# Altium PCB PCB1.PcbDoc (part 1 of 2)
Units mil, origin at the board's own origin, x right, y up, seen from the top; angles counter-clockwise.
Board outline 2620 x 2515 mil, 2 copper layers (Top Layer, Bottom Layer); 69 components, 45 nets, 203 pads, 16 vias.
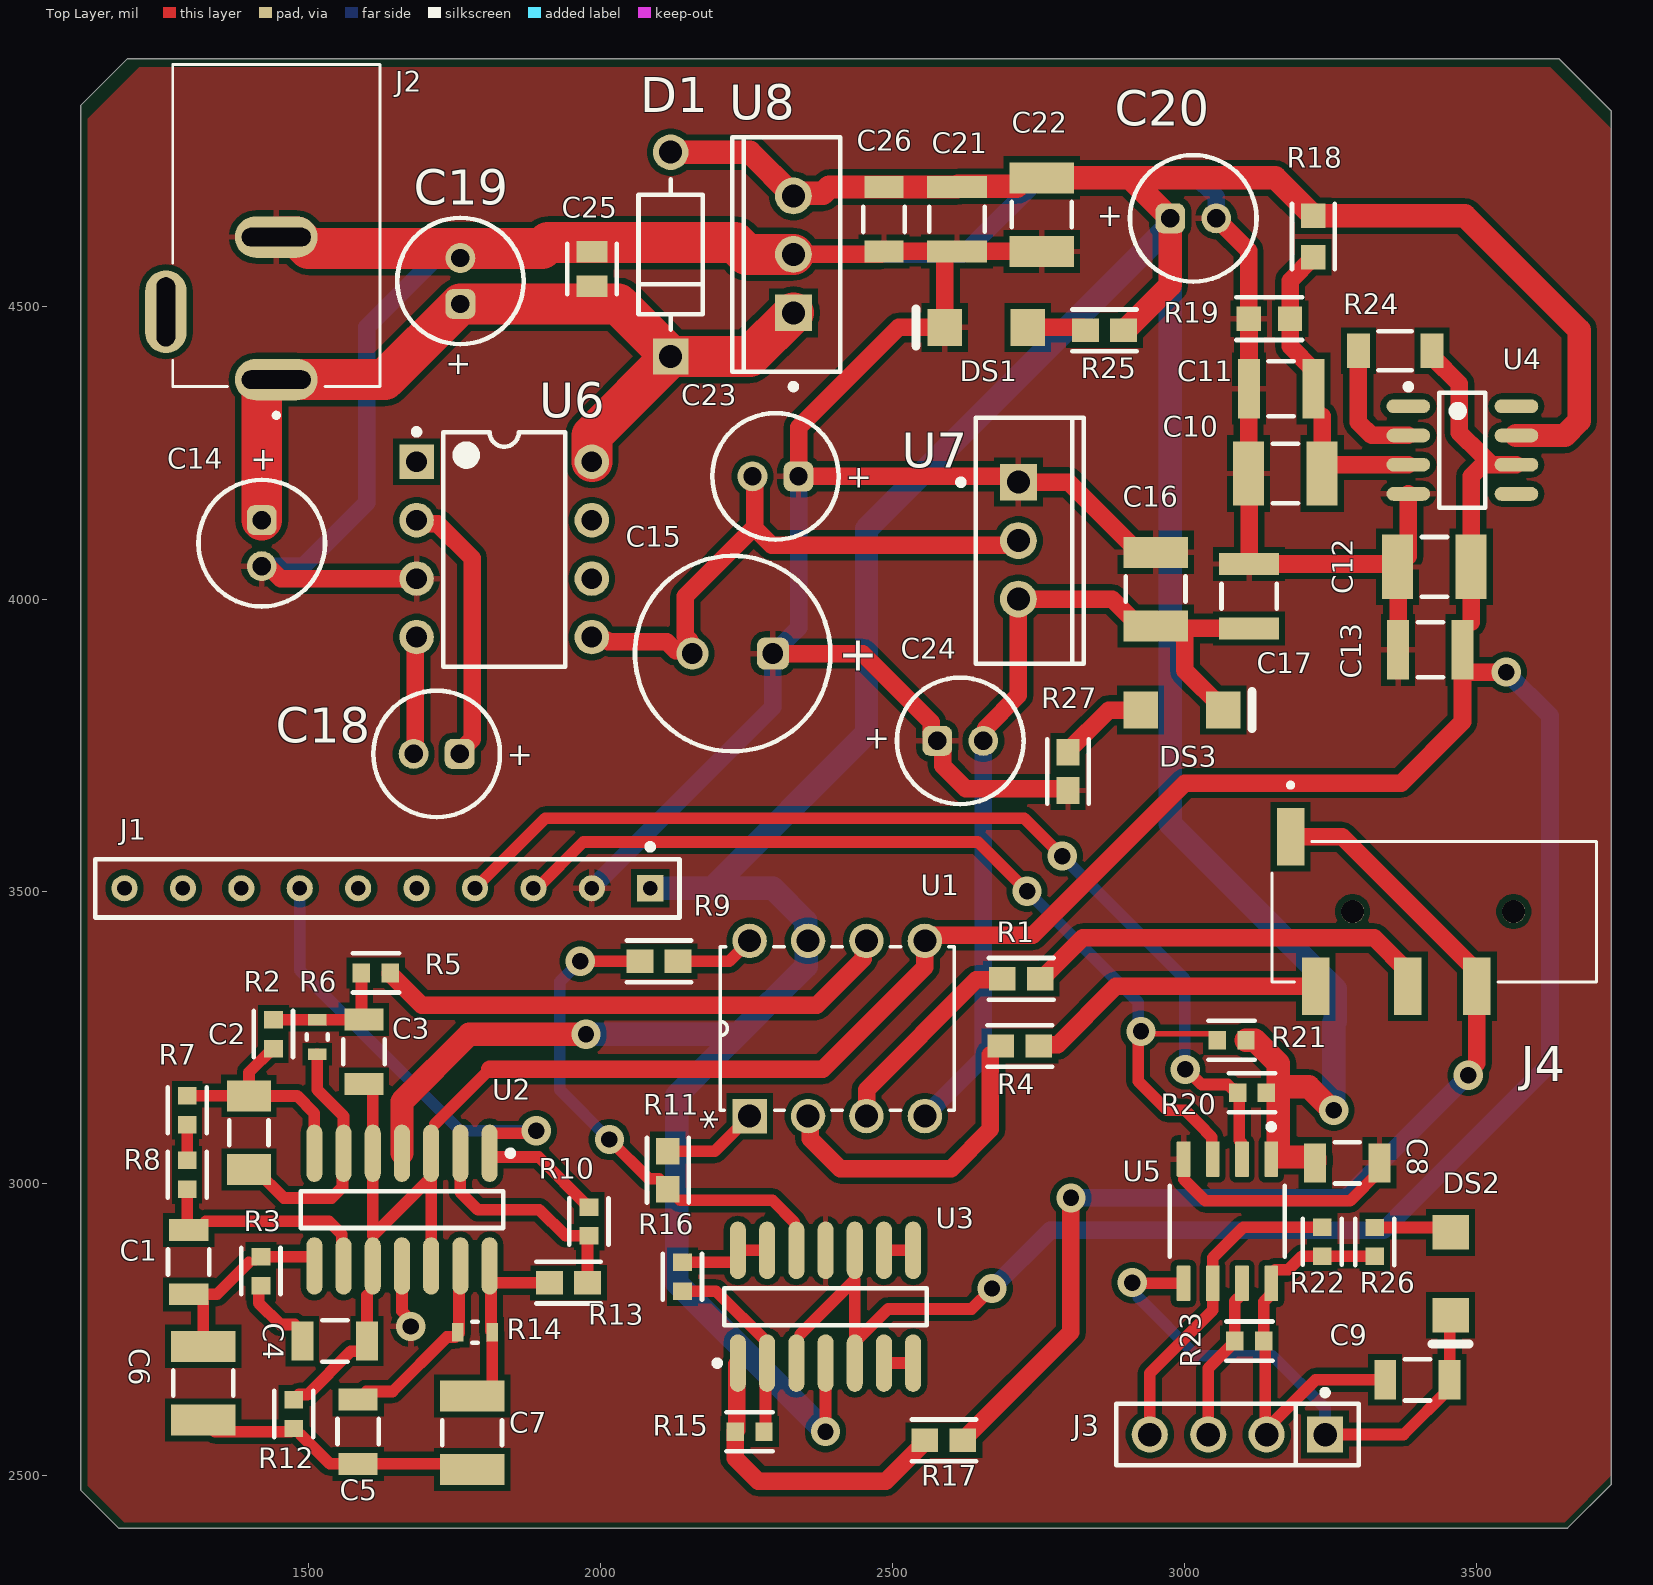
[diagram p0: Top Layer view]
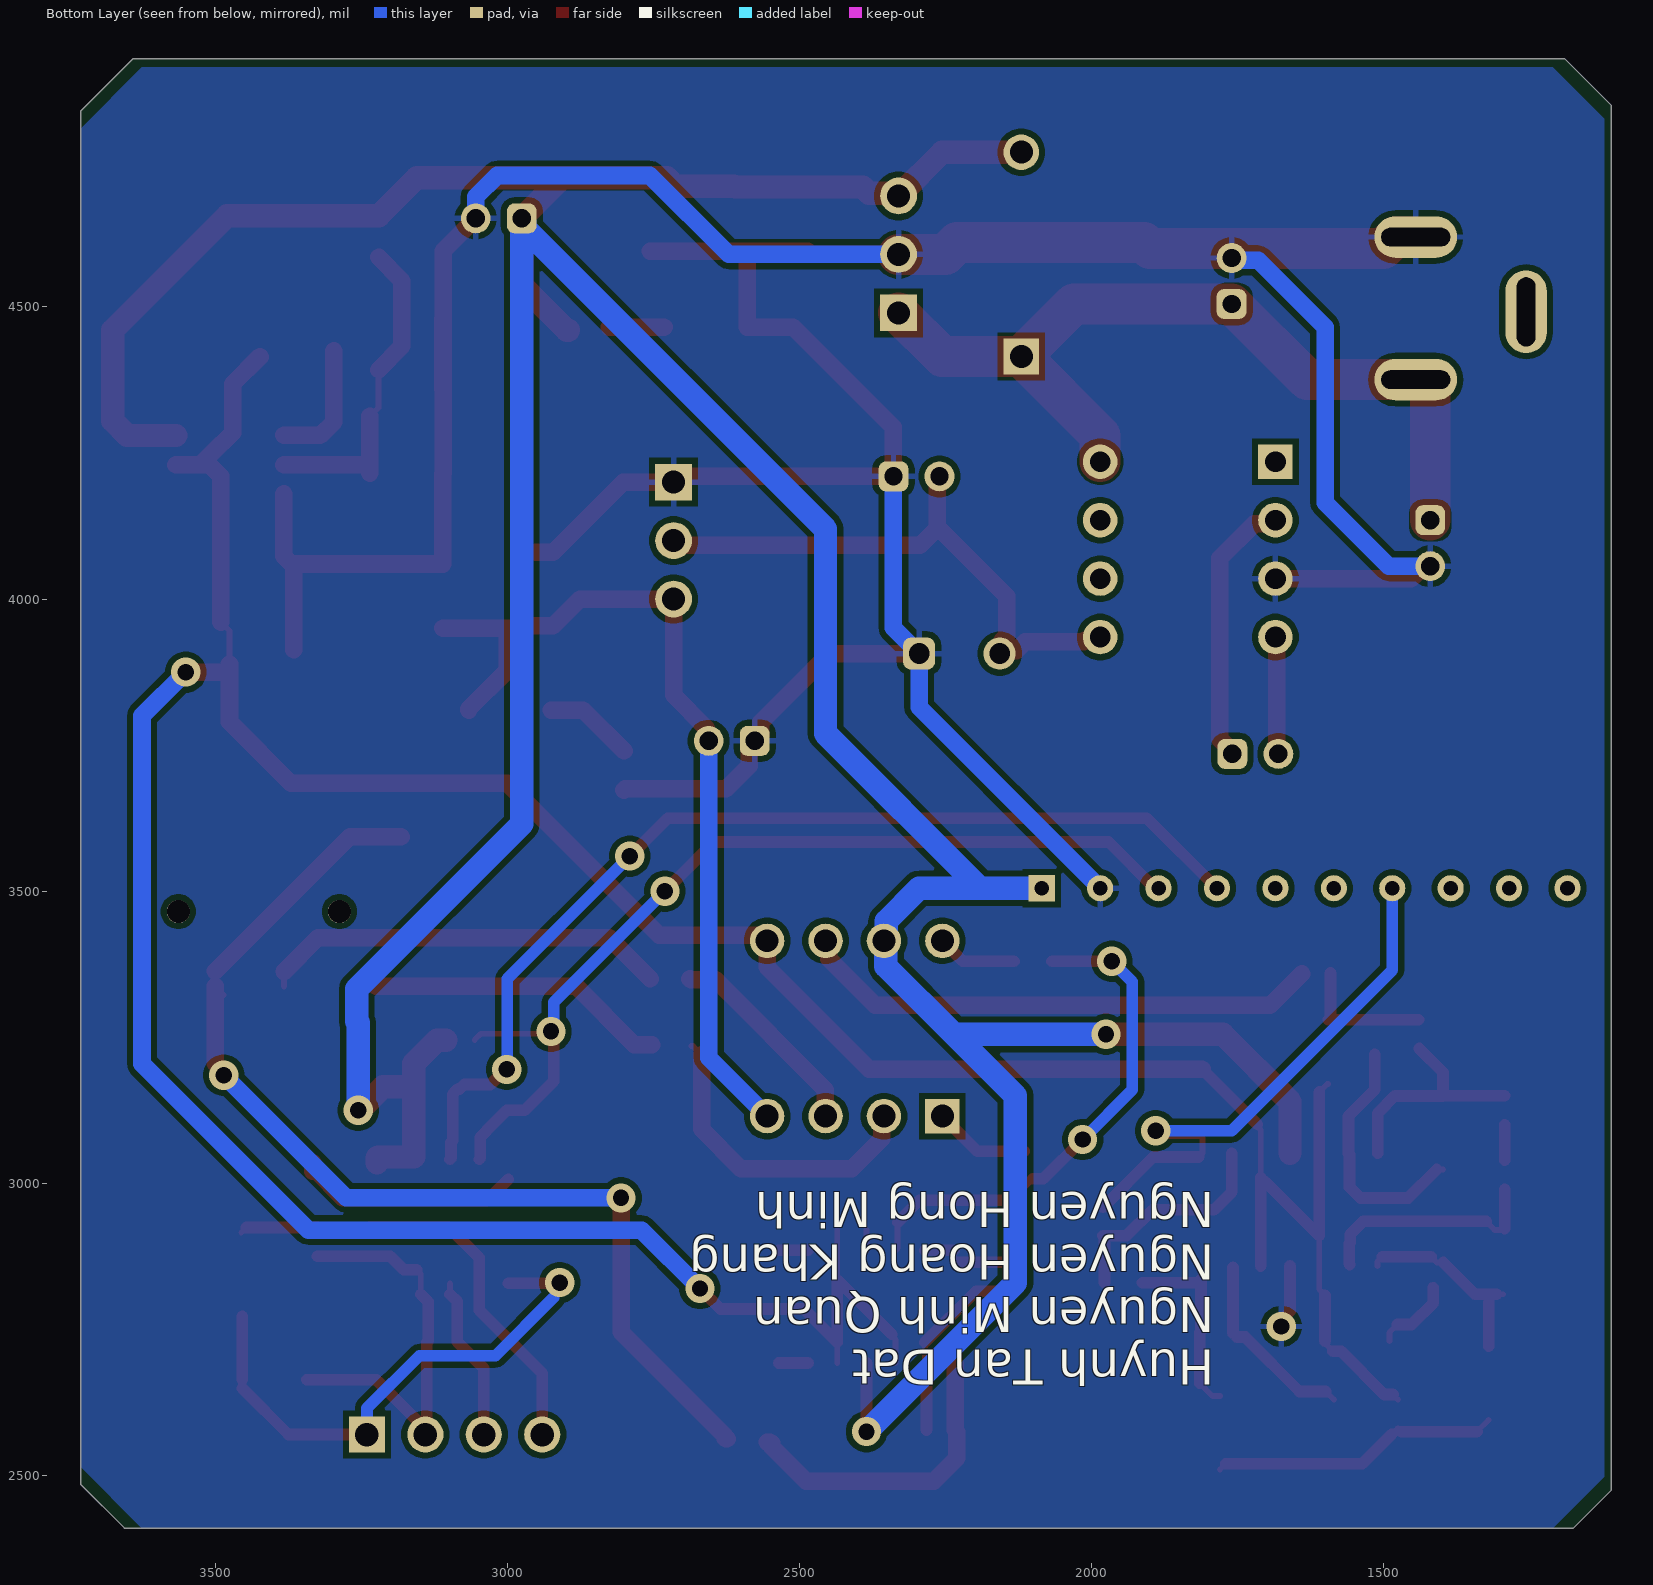
[diagram p1: Bottom Layer view, seen from below]
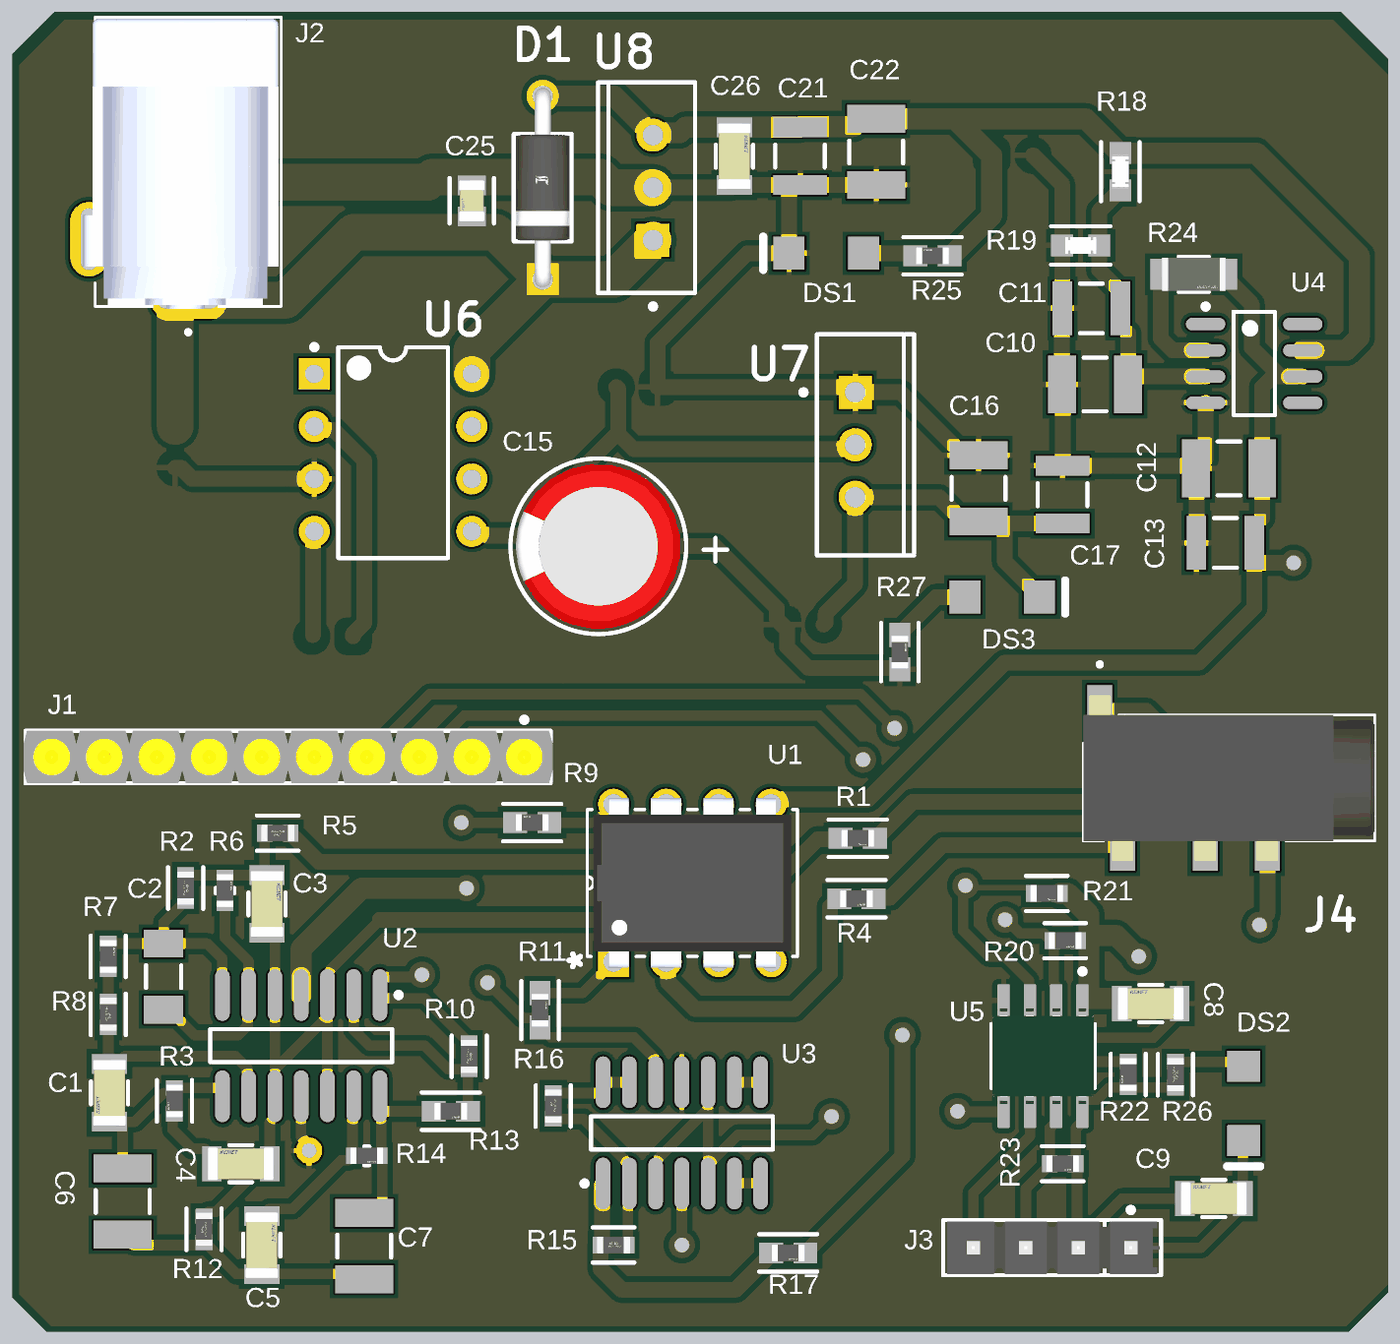
[diagram p2: 3D render of the assembled board from above, using the file's embedded part models]

## Layer stack, top to bottom
Top Solder: solder mask 0.4, Solder Resist, Dk 3.5
Top Layer: signal copper 1.4
Dielectric 1: dielectric 12.6, FR-4, Dk 4.8
Bottom Layer: signal copper 1.4
Bottom Solder: solder mask 0.4, Solder Resist, Dk 3.5

## Board outline
1190,4925 1110,4845 1110,2475 1175,2410 3655,2410 3730,2485 3730,4835 3640,4925

## Design rules (kind name [scope] priority, off if disabled: settings)
Clearance [All] p1: gap=10 ignorepadtopadclearanceinfootprint=FALSE except(0: Arc-Hole Track-Hole SMDPad-Hole THPad-Hole Via-Hole Fill-Hole Poly-Hole Region-Hole Text-Hole)
PolygonConnect [All] p1: connectstyle=Relief reliefconductorwidth=10 reliefentries=4 polygonreliefangle="90 Angle" airgapwidth=10
RoutingVias [All] p1: holewidth=28 width=50 viastyle="Through Hole" minholewidth=28 minwidth=50 maxholewidth=28 maxwidth=50
SolderMaskExpansion [All] p1: expansion=4 istentingtop=FALSE
Width [All] p1: maxlimit=70 minlimit=10 preferedwidth=10 minimp=50.000000 maximp=50.000000 favimp=50.000000
30 further rules are at their usual default settings.

## Classes and differential pairs
component class Sheet3: DS3 J1 J2 J3 J4 R27
component class Sheet2: C8 C9 C10 C11 C12 C13 C14 C15 C16 C17 C18 C19 C20 C21 C22 C23 C24 C25 C26 D1 DS1 DS2 R18 R19 R20 R21 R22 R24 R25 R26 U4 U5 U6 U7 U8
component class Sheet1: C1 C2 C3 C4 C5 C6 C7 R1 R2 R3 R4 R5 R6 R7 R8 R9 R10 R11 R12 R13 R14 R15 R16 R17 U1 U2 U3

## Components (designator, comment, footprint, x,y, rotation, side; value= is the part's Value field where it differs from the comment)
C1 "10n" FP-C1206C-EB-MFG 1295,2865.12 r90 top value="10,000 pF"
C2 "4.7nF" CAPC1206(3216)170_M 1398.02,3086.6 r90 top
C3 "68n" FP-C1206C-EB-MFG 1595,3225.12 r270 top value="68,000 pF"
C4 "47n" FP-C1206C-EB-MFG 1545.12,2730 r0 top value="47,000 pF"
C5 "68n" FP-C1206C-EB-MFG 1585,2574.88 r270 top value="68,000 pF"
C6 "100nF" CAPC1210(3225)115_M 1320,2657.99 r90 top
C7 "100nF" CAPC1210(3225)115_M 1780,2572.99 r270 top
C8 "0.1uF" FP-C1206C-EB-MFG 3277.97,3035.1 r0 top value="0.10 μF"
C9 "0.1uF" FP-C1206C-EB-MFG 3398.04,2663.73 r0 top value="0.10 μF"
C10 "10uF" CAPC1210(3225)230_M 3172.01,4215 r0 top
C11 "100nF" CAPC1210(3225)190_L 3164.88,4360 r0 top
C12 "10uF" CAPC1210(3225)230_M 3427.01,4055 r0 top
C13 "100nF" CAPC1210(3225)190_L 3420.12,3913.1 r0 top
C14 "2.2uF" WCAP-ATG8_D5H11 -48580,54095.63 r90 top
C15 "100uF" WCAP-PTG5_D8H11.5 2225.97,3906.68 r0 top
C16 "10uF" CAPC1210(3225)230_M 2950,4017.01 r270 top
C17 "100nF" CAPC1210(3225)190_L 3110,4004.88 r270 top
C18 "10uF" WCAP-ATG5_D5H11 51719.37,53735 r0 top
C19 "470nF" WCAP-ATG5_D5H11 51760,-45455.63 r270 top
C20 "470nF" WCAP-ATG5_D5H11 -46985.63,-45348.33 r180 top
C21 "100nF" CAPC1210(3225)190_L 2610,4650.12 r90 top
C22 "10uF" CAPC1210(3225)230_M 2755,4657.99 r90 top
C23 "33uF" WCAP-ATG5_D5H11 52299.37,54210 r0 top
C24 "33uF" WCAP-ATG5_D5H11 -47384.37,-46242.69 r180 top
C25 "0.33uF" FP-C0805C-DN-MFG 1985,4565 r90 top value="0.33 μF"
C26 "0.1uF" FP-C1206C-EB-MFG 2485,4650 r270 top value="0.10 μF"
D1 "1N4007" FP-1N4007-MFG 2120,4590 r90 top value=15pF
DS1 "" LTST-C230KGKT_V 2660,4465 r180 top
DS2 "" LTST-C230KGKT_V 3455,2845 r270 top
DS3 "" LTST-C230KGKT_V 2995,3810 r0 top
J1 "ADS1115" FP-TS-110-T-A-MFG 1635,3505 r180 top
J2 "PJ-035D" CUI_PJ-035D 1444.87,4375.52 r180 top
J3 "I2C" FP-TSW-104-23-T-S-MFG 3090,2570 r180 top
J4 "PJ-320D-A" HRO_PJ-320D-A 3425,3465 r180 top
R1 "1k" FP-ESR03-IPC_A 2720,3350 r180 top
R2 "22k" FP-CRGP0603-IPC_C 1440,3255.32 r270 top value=22KΩ
R3 "56k" FP-ESR03-IPC_C 1418.69,2849.68 r90 top
R4 "1k" FP-ESR03-IPC_A 2717.56,3235 r180 top
R5 "22k" FP-CRGP0603-IPC_C 1615.32,3360 r180 top value=22KΩ
R6 "18k" FP-ESR03-MFG 1515,3250.47 r270 top
R7 "56k" FP-ESR03-IPC_C 1292.54,3125 r270 top
R8 "4.7k" FP-CRGP0603-IPC_C 1292.54,3014.68 r270 top value=4.7KΩ
R9 "510" FP-ESR03-IPC_A 2100,3380 r0 top
R10 "100k" FP-CRGP0603-IPC_C 1980,2934.68 r270 top value=100KΩ
R11 "510" FP-ESR03-IPC_A 2115,3022.56 r270 top
R12 "39k" FP-CRGP0603-IPC_C 1475,2605 r90 top value=39KΩ
R13 "20k" FP-ESR03-IPC_A 1945,2830 r180 top
R14 "220k" FP-ESR03-MFG 1785,2745 r180 top
R15 "100k" FP-CRGP0603-IPC_C 2255,2575 r0 top value=100KΩ
R16 "100k" FP-CRGP0603-IPC_C 2140,2840 r90 top value=100KΩ
R17 "1k" FP-ESR03-IPC_A 2587.56,2560 r180 top
R18 "10k" FP-ERJPA3-IPC_A 3220,4620.45 r90 top
R19 "10k" FP-ERJPA3-IPC_A 3144.55,4480 r0 top
R20 "2.2k" FP-ESR03-IPC_C 3115,3155 r180 top
R21 "2.2k" FP-ESR03-IPC_C 3080,3245 r180 top
R22 "1.8k" FP-ESR03-IPC_C 3235,2900 r90 top
R23 "1.8k" FP-ESR03-IPC_C 3110.32,2730 r180 top
R24 "4.99k" FP-AC1206-MFG 3360,4425 r0 top value=4.99KΩ
R25 "1k" FP-ESR03-IPC_A 2862.44,4460 r0 top
R26 "470" FP-CRGP0603-IPC_C 3325,2899.68 r270 top value=470Ω
R27 "1k" FP-ESR03-IPC_A 2800,3705 r270 top
U1 "AD623ANZ" DIP254P762X533-8 2555,3415 r90 top
U2 "MCP6004-I/SL" SOIC-SL14_M 1660,2955 r270 top
U3 "MCP6004-I/SL" SOIC-SL14_M 2385,2788.75 r90 top
U4 "AD8031ARZ" ADI-R-8_L 3475,4255 r0 top
U5 "ISO1540DR" FP-D0008A-MFG 3072.85,2935.1 r270 top
U6 "LT1054CN8#PBF" LT-N8-8 1835,4085 r0 top
U7 "LM7905CT" NDE0003A 2715,4100 r270 top
U8 "LM7805CT" FAIR-TO-220-3 2330,4590 r180 top

## Footprints (in the part's own frame and the unit in brackets; to place one, negate y for a bottom-side part, rotate by r counter-clockwise, add the part's x,y. Pads: shape width x height; smd on the part's side, far side on the other; paste and mask are expansions set on the pad)
ADI-R-8_L [mm] "SOIC, 8-Leads, Body 4.9x3.9mm, Pitch 1.27mm, IPC High Density"
  oval 1.9x0.6 smd: 1(-2.35,1.905) 2(-2.35,0.635) 3(-2.35,-0.635) 4(-2.35,-1.905) 5(2.35,-1.905) 6(2.35,-0.635) 7(2.35,0.635) 8(2.35,1.905)
  silkscreen extent -2.47,-2.5 1,2.88, body extent -2,-2.5 2,2.5, height 1.75
CAPC1206(3216)170_M [mm] "Chip Capacitor, Body 3.2x1.6mm, Height 1.7mm, IPC Low Density"
  rect 1.35x1.9 smd: 1(-1.6,0) 2(1.6,0)
  silkscreen extent -0.55,-0.85 0.55,0.85, body extent -1.7,-0.9 1.7,0.9, height 1.7
CAPC1210(3225)115_M [mm] "Chip Capacitor, Body 3.2x2.5mm, Height 1.15mm, IPC Low Density"
  rect 1.35x2.8 smd: 1(-1.6,0) 2(1.6,0)
  silkscreen extent -0.55,-1.3 0.55,1.3, body extent -1.7,-1.35 1.7,1.35, height 1.15
CAPC1210(3225)190_L [mm] "Chip Capacitor, Body 3.2x2.5mm, Height 1.9mm, IPC High Density"
  rect 0.95x2.6 smd: 1(-1.4,0) 2(1.4,0)
  silkscreen extent -0.55,-1.2 0.55,1.2, body extent -1.7,-1.35 1.7,1.35, height 1.9
CAPC1210(3225)230_M [mm] "Chip Capacitor, Body 3.2x2.5mm, Height 2.3mm, IPC Low Density"
  rect 1.35x2.8 smd: 1(-1.6,0) 2(1.6,0)
  silkscreen extent -0.55,-1.3 0.55,1.3, body extent -1.7,-1.35 1.7,1.35, height 2.3
CUI_PJ-035D [mm]
  oval 3.6x1.8 hole 0.8 slot 3 at 0 deg mask+0.102: 1(0,0) 2(0,-6.2)
  oval 1.8x3.6 hole 0.8 slot 3 at 90 deg mask+0.102: 3(4.8,-2.95)
  silkscreen extent -4.5,-13.7 4.5,1.65, body extent -4.37,-13.63 5.08,0.42, height 11.1
DIP254P762X533-8 [mil]
  rect 59x59 / inner round 59 / far side rect 59x59 hole 39: 1(-300,300)
  round 59 hole 39: 2(-300,200) 3(-300,100) 4(-300,0) 5(0,0) 6(0,100) 7(0,200) 8(0,300)
  silkscreen extent -290,-50 -10,350, body extent -312,-39 12,339, height 210
FAIR-TO-220-3 [mm] "FM, 3-Leads, Body 10.2x4.7mm, Pitch 2.54mm"
  rect 1.6x1.6 hole 1: 1(0,2.54)
  round 1.6 hole 1: 2(0,0) 3(0,-2.54)
  silkscreen extent -2.04,-5.1 2.66,5.87, body extent -2.04,-5.1 2.66,5.1, height 18.95
FP-1N4007-MFG [mm]
  rect 1.55x1.55 hole 1 paste-1000 mask+0: 1(-4.44,0)
  round 1.55 hole 1 paste-1000 mask+0: 2(4.44,0)
  silkscreen extent -3.26,-1.4 3.26,1.4, body extent -5.32,-1.5 5.32,1.5, height 0.25
FP-AC1206-MFG [mm]
  rect 1x1.5 smd paste+0 mask+0: 1(-1.6,0) 2(1.6,0)
  silkscreen extent -0.72,-0.85 0.72,0.85, body extent -2.2,-0.95 2.2,0.95, height 0.25
FP-C0805C-DN-MFG [mm]
  rect 0.95x1.35 smd paste+0 mask+0: 1(-0.75,0) 2(0.75,0)
  silkscreen extent -1.1,-1.07 1.1,1.07, body extent -1.4,-0.85 1.4,0.85, height 0.25
FP-C1206C-EB-MFG [mm]
  rect 0.95x1.7 smd paste+0 mask+0: 1(-1.4,0) 2(1.4,0)
  silkscreen extent -0.55,-0.9 0.55,0.9, body extent -2,-1 2,1, height 0.25
FP-CRGP0603-IPC_C [mil]
  rect 29.85x31.97 smd paste+0 mask+0: 1(-24.68,0) 2(24.68,0)
  silkscreen extent -40,-33 40,33, body extent -44,-22 44,22, height 10
FP-D0008A-MFG [mm]
  rrect17% 1.55x0.6 smd paste+0 mask+0: 1(-2.7,1.905) 2(-2.7,0.635) 3(-2.7,-0.635) 4(-2.7,-1.905) 5(2.7,-1.905) 6(2.7,-0.635) 7(2.7,0.635) 8(2.7,1.905)
  silkscreen extent -4.22,-2.5 1.55,2.5, body extent -3.57,-2.75 3.57,2.75, height 0.25
FP-ERJPA3-IPC_A [mil]
  rect 41.62x41.82 smd paste+0 mask+0: 1(-35.45,0) 2(35.45,0)
  silkscreen extent -56,-37 56,37, body extent -76,-41 76,41, height 10
FP-ESR03-IPC_A [mil]
  rect 45.6x39.85 smd paste+0 mask+0: 1(-32.56,0) 2(32.56,0)
  silkscreen extent -55,-36 55,36, body extent -75,-40 75,40, height 10
FP-ESR03-IPC_C [mil]
  rect 29.85x31.97 smd paste+0 mask+0: 1(-24.68,0) 2(24.68,0)
  silkscreen extent -40,-33 40,33, body extent -44,-22 44,22, height 10
FP-ESR03-MFG [mm]
  rect 0.5x0.8 smd paste+0 mask+0: 1(-0.75,0) 2(0.75,0)
  silkscreen extent -0.13,-0.45 0.13,0.45, body extent -1.1,-0.55 1.1,0.55, height 0.25
FP-TS-110-T-A-MFG [mm]
  rect 1.135x1.135 hole 0.635 paste-1000 mask+0: 1(-11.43,0)
  round 1.135 hole 0.635 paste-1000 mask+0: 2(-8.89,0) 3(-6.35,0) 4(-3.81,0) 5(-1.27,0) 6(1.27,0) 7(3.81,0) 8(6.35,0) 9(8.89,0) 10(11.43,0)
  silkscreen extent -12.7,-1.92 12.7,1.27, body extent -12.8,-1.37 12.8,1.37, height 0.25
FP-TSW-104-23-T-S-MFG [mm]
  rect 1.57x1.57 hole 1.02 paste-1000 mask+0: 1(-3.81,0)
  round 1.57 hole 1.02 paste-1000 mask+0: 2(-1.27,0) 3(1.27,0) 4(3.81,0)
  silkscreen extent -5.27,-1.95 5.27,1.34, body extent -5.37,-1.44 5.37,1.44, height 0.25
HRO_PJ-320D-A [mm]
  rect 1.2x2.5 smd: 1(6.2,-3.25) 2(5.1,3.25) 3(1.1,3.25) 4(-1.9,3.25)
  round 1 hole 1 unplated: ""(-3.5,0) ""(3.5,0)
  silkscreen extent -7.1,-5.6 7,3.05, body extent -7.1,-4 7,4, height 5.3
LT-N8-8 [mm] "DIP, 8-Leads, Body 10.15x6.85mm, Pitch 2.54mm"
  rect 1.5x1.5 hole 0.9: 1(-3.81,3.81)
  round 1.5 hole 0.9: 2(-3.81,1.27) 3(-3.81,-1.27) 4(-3.81,-3.81) 5(3.81,-3.81) 6(3.81,-1.27) 7(3.81,1.27) 8(3.81,3.81)
  silkscreen extent -3.93,-5.1 2.65,5.23, body extent -3.95,-5.07 3.95,5.07, height 3.94
LTST-C230KGKT_V [mm] "SMD, 2-Leads, Body 3.2x1.6mm"
  rect 1.5x1.6 smd: 1(-1.8,0) 2(1.8,0)
  silkscreen extent 3.05,-0.8 3.05,0.8, body extent -1.6,-0.8 1.6,0.8, height 0.38
NDE0003A [mm] "FM, 3-Leads, Body 10.7x4.7mm, Pitch 2.54mm"
  rect 1.6x1.6 hole 1: 1(-2.54,0)
  round 1.6 hole 1: 2(0,0) 3(2.54,0)
  silkscreen extent -5.35,-2.62 5.35,2.85, body extent -5.4,-1.9 5.4,2.9, height 19.4
SOIC-SL14_M [mm] "SOIC, 14-Leads, Body 8.7x3.9mm, Pitch 1.27mm, IPC Low Density"
  oval 2.5x0.7 smd: 1(-2.45,3.81) 2(-2.45,2.54) 3(-2.45,1.27) 4(-2.45,0) 5(-2.45,-1.27) 6(-2.45,-2.54) 7(-2.45,-3.81) 8(2.45,-3.81) 9(2.45,-2.54) 10(2.45,-1.27) 11(2.45,0) 12(2.45,1.27) 13(2.45,2.54) 14(2.45,3.81)
  silkscreen extent -2.57,-4.4 0.8,4.84, body extent -2,-4.38 2,4.38, height 1.75
WCAP-ATG5_D5H11 [mm] "Aluminum Electrolytic Capacitors, 5x11mm"
  rrect50% 1.3x1.3 hole 0.8: 1(-1269,-1270)
  round 1.3 hole 0.8: 2(-1271,-1270)
  silkscreen extent -1272.75,-1272.75 -1267.25,-1267.25, body extent -1272.49,-1272.5 -1267.5,-1267.5, height 11.31
WCAP-ATG8_D5H11 [mm] "Aluminum Electrolytic Capacitors, 5x11mm"
  rrect50% 1.3x1.3 hole 0.8: 1(-1269,-1270)
  round 1.3 hole 0.8: 2(-1271,-1270)
  silkscreen extent -1272.75,-1272.75 -1267.25,-1267.25, body extent -1272.49,-1272.5 -1267.5,-1267.5, height 11.31
WCAP-PTG5_D8H11.5 [mm] "Aluminum Polymer Capacitors, 8x11.5mm"
  rrect50% 1.4x1.4 hole 0.9: 1(1.75,0)
  round 1.4 hole 0.9: 2(-1.75,0)
  silkscreen extent -4.25,-4.25 4.25,4.25, body extent -3.99,-4 3.97,3.98, height 11.81

## Part data
C1: library part CMP-1037-03498-2, "CAP CER 10000PF 50V NP0 1206", Capacitance="10,000 pF", Manufacturer=KEMET, Manufacturer Part Number=C1206C103F5GACTU, Package=C1206C-EB, Temperature="-55°C to +150°C", Temperature Characteristic=C0G, Temperature Coefficient=15%, Temperature Range High=+150°C, Temperature Range Low=-55°C, Tolerance=0.01, Voltage Rating="50 V", Automotive=Yes, Automotive Grade="Grade 0", Category=Cap, ComponentLink2Description=Datasheet, ComponentLink2URL=https://content.kemet.com/datasheets/KEM_C1007_X8R_ULTRA_150C_SMD.pdf, Device Class L1="Passive Components", Device Class L2=Capacitors, Device Class L3="Ceramic Capacitors", Digikey Description="CAP CER 10000PF 50V NP0 1206", Height=0.88mm, Ipc Land Pattern Name=CAPC320160X78, Lead Free=Yes, Material=Ceramic, Octopart=https://octopart.com/c1206c103f5gactu-kemet-19050582, RoHS=TRUE
C2: library part CMP-1037-03108-1, "CAP 4.7nF 50V ±1% 1206 (3216 Metric) Thickness 1.7mm SMD", Case-EIA=1206, Case-Metric=3216, Rated Voltage="50 V", Tolerance=Â±1%, Max Thickness="1.7 mm", Technology=SMT
C3 C5: library part CMP-1037-04086-2, "CAP CER 0.068UF 50V NP0 1206", Capacitance="68,000 pF", Manufacturer=KEMET, Manufacturer Part Number=C1206C683F5GACTU, Package=C1206C-EB, Temperature="-55°C to +150°C", Temperature Characteristic=C0G, Temperature Coefficient=15%, Temperature Range High=+150°C, Temperature Range Low=-55°C, Tolerance=0.01, Voltage Rating="50 V", Automotive=Yes, Automotive Grade="Grade 0", Category=Cap, ComponentLink2Description=Datasheet, ComponentLink2URL=https://content.kemet.com/datasheets/KEM_C1007_X8R_ULTRA_150C_SMD.pdf, Device Class L1="Passive Components", Device Class L2=Capacitors, Device Class L3="Ceramic Capacitors", Digikey Description="CAP CER 0.068UF 50V NP0 1206", Height=0.88mm, Ipc Land Pattern Name=CAPC320160X78, Lead Free=Yes, Material=Ceramic, Mouser Description="Multilayer Ceramic Capacitors MLCC - SMD/SMT 50volts 0.068uF 1% C0G", Octopart=https://octopart.com/c1206c683f5gactu-kemet-19050752, RoHS=TRUE
C4: library part CMP-1037-03977-2, "CAP CER 0.047UF 50V NP0 1206", Capacitance="47,000 pF", Manufacturer=KEMET, Manufacturer Part Number=C1206C473F5GACTU, Package=C1206C-EB, Temperature="-55°C to +150°C", Temperature Characteristic=C0G, Temperature Coefficient=15%, Temperature Range High=+150°C, Temperature Range Low=-55°C, Tolerance=0.01, Voltage Rating="50 V", Automotive=Yes, Automotive Grade="Grade 0", Category=Cap, ComponentLink2Description=Datasheet, ComponentLink2URL=https://content.kemet.com/datasheets/KEM_C1007_X8R_ULTRA_150C_SMD.pdf, Device Class L1="Passive Components", Device Class L2=Capacitors, Device Class L3="Ceramic Capacitors", Digikey Description="CAP CER 0.047UF 50V NP0 1206", Height=0.88mm, Ipc Land Pattern Name=CAPC320160X78, Lead Free=Yes, Material=Ceramic, Mouser Description="Multilayer Ceramic Capacitors MLCC - SMD/SMT 50volts 0.047uF 1% C0G", Octopart=https://octopart.com/c1206c473f5gactu-kemet-13140371, RoHS=TRUE
C6 C7: library part CMP-1038-01632-1, "CAP 100nF 16V ±1% 1210 (3225 Metric) Thickness 1.1mm SMD", Case-EIA=1210, Case-Metric=3225, Rated Voltage="16 V", Tolerance=Â±1%, Max Thickness="1.1 mm", Technology=SMT
C8 C9 C26: library part CMP-03020-004485-1, "C1206 0.10 μF U2J 1.00% 25 V", Capacitance="0.10 μF", Manufacturer=KEMET, Manufacturer Part Number=C1206C104F3JACAUTO, Package=C1206C-EB, Temperature="-55°C to +150°C", Temperature Characteristic=U2J, Temperature Coefficient=15%, Temperature Range High=+150°C, Temperature Range Low=-55°C, Tolerance=0.01, Voltage Rating="25 V", Automotive=Yes, Automotive Grade="Grade 0", Category=Cap, ComponentLink2Description=Datasheet, ComponentLink2URL=https://content.kemet.com/datasheets/KEM_C1007_X8R_ULTRA_150C_SMD.pdf, Device Class L1="Passive Components", Device Class L2=Capacitors, Device Class L3="Ceramic Capacitors", Height=0.88mm, Ipc Land Pattern Name=CAPC320160X78, Lead Free=Yes, Material=Ceramic, Octopart=https://octopart.com/c1206c104f3jacauto-kemet-84732508, RoHS=TRUE
C10 C12 C16 C22: library part CMP-1038-02200-3, "CAP 10uF 10V ±20% 1210 (3225 Metric) Thickness 2.2mm SMD", Case-EIA=1210, Case-Metric=3225, Rated Voltage="10 V", Tolerance=Â±20%, Max Thickness="2.2 mm", Technology=SMT
C11 C13 C17 C21: library part CMP-1038-01673-1, "CAP 100nF 100V ±20% 1210 (3225 Metric) Thickness 1.9mm SMD", Case-EIA=1210, Case-Metric=3225, Rated Voltage="100 V", Tolerance=Â±20%, Max Thickness="1.9 mm", Technology=SMT
C14: library part CMP-03913-54007285-2, "WCAP-ATG8 Aluminum Electrolytic Capacitors", Capacitance=2.2µF, Case/Package=Radial, Leakage Current=3µA, Manufacturer Lifecycle Status=ACTIVE, Max Operating Temperature=85°C, Min Operating Temperature=-40°C, Ripple Current=31mA, Tolerance=20%, Voltage Rating=63V, Diameter=5mm, Height=11mm, Height - Seated (Max)=12.4968mm, Lead Pitch=2.0066mm, Length=11mm, Life (Hours)=2000hours, Lifecycle Status=Production, Mount="Through Hole", Packaging="Tape & Box (TB)", Pitch=2mm, Polarity=Polar, REACH SVHC=Unknown, RoHS=Compliant, Voltage Rating (DC)=63V, YEOL="1 = Estimated lifetime > 10 years"
C15: library part CMP-03913-54202572-2, "WCAP-PTG5 Aluminum Polymer Capacitors", Capacitance=100µF, Case/Package=Radial, ESR (Equivalent Series Resistance)=12mΩ, Leakage Current=160µA, Manufacturer Lifecycle Status=ACTIVE, Max Operating Temperature=105°C, Min Operating Temperature=-55°C, Ripple Current=4.8A, Tolerance=20%, Voltage Rating=16V, Diameter=8mm, Height - Seated (Max)=13.0048mm, Lead Pitch=3.5052mm, Length=11.5mm, Life (Hours)=2000hours, Lifecycle Status=Production, Mount="Through Hole", Packaging="Tape & Box (TB)", Pitch=3.5mm, Polarity=Polar, REACH SVHC=Unknown, RoHS=Compliant, Voltage Rating (DC)=16V, YEOL="1 = Estimated lifetime > 10 years"
C18: library part CMP-03913-53914252-2, "WCAP-ATG5 Aluminum Electrolytic Capacitors", Capacitance=10µF, Case/Package=Radial, Leakage Current=6.3µA, Manufacturer Lifecycle Status=ACTIVE, Max Operating Temperature=105°C, Min Operating Temperature=-40°C, Ripple Current=42mA, Tolerance=20%, Voltage Rating=63V, Diameter=5mm, Height=11mm, Height - Seated (Max)=12.4968mm, Lead Pitch=2.0066mm, Length=11mm, Life (Hours)=2000hours, Lifecycle Status=Production, Material=Aluminium, Mount="Through Hole", Packaging="Tape & Box (TB)", Pitch=2mm, Polarity=Polar, REACH SVHC=Unknown, RoHS=Compliant, Voltage Rating (DC)=63V, YEOL="1 = Estimated lifetime > 10 years"
C19 C20: library part CMP-03913-53914227-2, "WCAP-ATG5 Aluminum Electrolytic Capacitors", Case/Package=Radial, Leakage Current=3µA, Max Operating Temperature=105°C, Min Operating Temperature=-40°C, Ripple Current=7mA, Tolerance=20%, Voltage Rating=50V, Capacitance=470nF, Diameter=5mm, Height=11mm, Height - Seated (Max)=12.4968mm, Lead Pitch=2.0066mm, Length=11mm, Life (Hours)=2000hours, Mount="Through Hole", Packaging="Tape & Box (TB)", Pitch=2mm, Polarity=Polar, REACH SVHC=Unknown, RoHS=Compliant, Voltage Rating (DC)=50V
C23 C24: library part CMP-03913-53914235-2, "WCAP-ATG5 Aluminum Electrolytic Capacitors", Capacitance=33µF, Case/Package=Radial, Leakage Current=16.5µA, Max Operating Temperature=105°C, Min Operating Temperature=-40°C, Ripple Current=75mA, Tolerance=20%, Voltage Rating=50V, Diameter=5mm, Height=11mm, Height - Seated (Max)=12.4968mm, Lead Pitch=2.0066mm, Length=11mm, Life (Hours)=2000hours, Material=Aluminium, Mount="Through Hole", Packaging="Tape & Box (TB)", Pitch=2mm, Polarity=Polar, REACH SVHC=Unknown, RoHS=Compliant, Voltage Rating (DC)=50V
C25: library part CMP-2007-03276-2, "CAP CER 0.33UF 25V X7R 0805", Capacitance="0.33 μF", Manufacturer=KEMET, Manufacturer Part Number=C0805C334J3RACTU, Package=C0805C-DN, Temperature="-55°C to +125°C", Temperature Characteristic=X7R, Temperature Coefficient=30ppm/°C, Temperature Range High=+125°C, Temperature Range Low=-55°C, Tolerance=0.05, Voltage Rating="25 V", Automotive=No, Category=Cap, ComponentLink2Description=Datasheet, ComponentLink2URL=https://content.kemet.com/datasheets/KEM_C1003_C0G_SMD.pdf, Device Class L1="Passive Components", Device Class L2=Capacitors, Device Class L3="Ceramic Capacitors", Digikey Description="CAP CER 0.33UF 25V X7R 0805", Height=0.88mm, Ipc Land Pattern Name=CAPC200125X78, Lead Free=Yes, Material=Ceramic, Mouser Description="Capacitor, Ceramic, 330000Pf, 25Vdc, 5-% Tol, 5+% Tol, X7r-Tc Code, -15, 15%-Tc", Octopart=https://octopart.com/c0805c334j3ractu-kemet-9143333, RoHS=TRUE
D1: library part CMP-123542-000001-1, "Rectifier diode 1000 V 1 A DO-41, ,", Capacitance=15pF, Forward Current=1A, Manufacturer=Diotec, Max Junction Temp=+175°C, Max Repetitive Reverse Voltage=1000V, Max Surge Forward Current=27A, Peak Reverse Current=5uA, Temperature="-50°C to +175°C", Temperature Range Low=-50°C, Automotive=No, Category=Diode, ComponentLink2Description=Datasheet, ComponentLink2URL=https://datasheet.octopart.com/1N4007-Diotec-datasheet-62346875.pdf, Device Class L1="Discrete Semiconductors", Device Class L2=Diodes, Device Class L3="Rectifier Diodes", Height=2.8mm, Ipc Land Pattern Name=DIOAD888W100L520D280, Lead Free=Yes, Manufacturer Part Number=1N4007, Octopart=https://octopart.com/1n4007-diotec-4040411, Package=1N4007, Reverse Voltage=1000V, RoHS=TRUE, Temperature Range High=+175°C
DS1 DS2 DS3: library part CMP-2000-06625-1, "LED Green, 75 mW, 30 mA, -30 to 85 degC, 2-Pin SMD, RoHS, Tape and Reel", Emitting Color=YellowGreen, Forward Current=30mA, Forward Voltage=2.4V, Manufacturer=Lite-On, Operating Temp Range=-55Cto85C, Operating Temperature Classification=Industrial, Package Description="2-Pin Surface Mount Device, Body 3.2 x 1.6 mm", Package Reference=C230KGKT, Package Type=ChipLed, Power Dissipation=75W, Reverse Voltage=5V, Test Current (It)=20mA, Chip Material=AlGaInP, Datasheet URL=http://optoelectronics.liteon.com/upload/download/DS22-2000-256/S_110_LTST-C230KGKT.pdf, Datasheet Version="Rev. G, 12/2014", DELETED=Compliant, Dominant Wave Length=571nm, High Brightness=Yes, Lens Dimensions=1.5X1.6X0.82mm, Lum Intensity=35mcd, Luminous Intensity=35mcd, Main Category=ChipLED, Manufacturer URL=http://www.us.liteon.com/, Mounting=SurfaceMount, Mounting Technology=SurfaceMount, Number of  Elements=1, Packaging=TapeandReel, Peak Wavelength=574nm, Pin Count=2, Product Depth (mm)=1.6mm, Product Height (mm)=1.1mm, Product Length (mm)=3.2mm, Rad Hardened=No, Shape Type=Rectangular, Type=Uni-Color, Viewing Angle=130deg
J1: library part CMP-02766-000078-1, "CONN HEADER VERT 10POS 2.54MM", Manufacturer=SAMTEC, Manufacturer Part Number=TS-110-T-A, Package=0, Temperature="-55°C to +105°C", Temperature Range High=+105°C, Temperature Range Low=-55°C, Automotive=No, Category=Conn, ComponentLink2Description=Datasheet, ComponentLink2URL=http://suddendocs.samtec.com/prints/tx-1xx-x-x-mkt1.pdf, Conn Gender=Male, Conn Orientation=Straight, Contact Material=Tin,Copper, Device Class L1=Connectors, Device Class L2="Headers and Wire Housings", Device Class L3=unset, Digikey Description="CONN HEADER VERT 10POS 2.54MM", Footprint Url=http://suddendocs.samtec.com/prints/tx-1xx-x-x-footprint.pdf, Height=8.16mm, Lead Free=Yes, Number Of Contacts=10, Number Of Rows=1, Octopart=https://octopart.com/ts-110-t-a-samtec-275237, Pitch=2.54mm, RoHS=TRUE
J2: "Power Barrel Connector Jack 1.30mm ID (0.051), 3.50mm OD (0.138) Through Hole, Right Angle", Package=None, Check_prices=https://www.snapeda.com/parts/PJ035D/Same+Sky/view-part/?ref=eda, MF="Same Sky", MP=PJ035D, SnapEDA_Link=https://www.snapeda.com/parts/PJ035D/Same+Sky/view-part/?ref=snap
J3: library part CMP-02766-001388-1, "CONN HEADER VERT 4POS 2.54MM", Color=Black, Max Current Rating=7.6A, Max Operating Temperature=105°C, Max Voltage Rating (AC)=550V, Min Operating Temperature=-55°C, Package Quantity=1, Connector Type="Male Pin", Contact Material=Bronze, Contact Mating Length=0.23inch, Contact Plating=Tin, Contact Type="Male Pin", Depth=2.54mm, Gender=Male, Housing Color=Black, Housing Material=Polyester, Lead Free="Lead Free", Length=10.16mm, Mount="Through Hole", Number Of Contacts=4, Number of Positions=4, Number Of Rows=1, Orientation=Straight, Packaging=Bulk, Pitch=2.54mm, Radiation Hardening=No, REACH SVHC="No SVHC", RoHS Compliant=Yes, Series=TSW, Termination=Solder, Width=2.54mm
J4: "Headphone jack 0.5A 30V DC 100 mÎ©", Package=Package, Availability="Not in stock", Check_prices=https://www.snapeda.com/parts/PJ-320D-A/HRO+Electronics+Co.%252C+Ltd./view-part/?ref=eda, MF="HRO Electronics Co., Ltd.", MP=PJ-320D-A, Price=None, SnapEDA_Link=https://www.snapeda.com/parts/PJ-320D-A/HRO+Electronics+Co.%252C+Ltd./view-part/?ref=snap
R1 R4 R17 R25 R27: library part CMP-08839-029483-1, "1kΩ ±1% 0.25W 0603 Anti-Surge Chip Resistor AEC-Q200", Case Code (Imperial)=0603, Case Code (Metric)=1608, Max Operating Temperature=155°C, Max Power Dissipation=250mW, Min Operating Temperature=-55°C, Package Quantity=1, Resistance=1kR, Resistor Type="Thick Film", Temperature Coefficient=100ppm/°C, Tolerance=1%, Case/Package=0603, Features="Automotive AEC-Q200", Height=0.022inch, Lead Free="Lead Free", Length=0.063inch, Number of Terminations=2, Packaging="Tape and Reel", Power Rating=250mW, RoHS Compliant=Yes, Series=ESR, Size Code=0603, Width=0.031inch
R2 R5: library part CMP-03211-006681-1, "CRGP 0603 22K 1%", Ambient Temperature Range High=+70°C, Manufacturer=TE, Manufacturer Part Number=CRGP0603F22K, Package=CRGP0603, Power Rating=0.25W, Resistance=22KΩ, Temperature="-55°C to +155°C", Temperature Coefficient=±100ppm/°C, Temperature Range High=+155°C, Temperature Range Low=-55°C, Tolerance=0.01, Voltage Rating=50V, Automotive=No, Category=Res, ComponentLink2Description=Datasheet, ComponentLink2URL=https://www.te.com/commerce/DocumentDelivery/DDEController?Action=srchrtrv&DocNm=9-1773463-9&DocType=DS&DocLang=English, Composition="Thick Film", Device Class L1="Passive Components", Device Class L2=Resistors, Device Class L3="Chip SMD Resistors", Digikey Description="CRGP 0603 22K 1%", Height=0.55mm, Ipc Land Pattern Name=RESC16080X45, Lead Free=Yes, Octopart=https://octopart.com/crgp0603f22k-te+connectivity-91018742, RoHS=TRUE, Series=CRGP
R3 R7: library part CMP-08839-002556-1, "56kΩ ±1% 0.25W 0603 Anti-Surge Chip Resistor AEC-Q200", Case/Package=0603, Max Operating Temperature=155°C, Max Power Dissipation=250mW, Min Operating Temperature=-55°C, Resistance=56kR, Resistor Type="Thick Film", Temperature Coefficient=100ppm/°C, Tolerance=1%, Features="Automotive AEC-Q200", Number of Terminations=2, Packaging="Tape and Reel", RoHS Compliant=Yes, Series=ESR
R6: library part CMP-08839-007579-1, "18kΩ ±1% 0.25W 0603 Anti-Surge Chip Resistor AEC-Q200", Case/Package=0603, Max Operating Temperature=155°C, Max Power Dissipation=250mW, Min Operating Temperature=-55°C, Package Quantity=5000, Resistance=18kR, Resistor Type="Thick Film", Temperature Coefficient=100ppm/°C, Tolerance=1%, Height=0.022inch, Length=0.063inch, Number of Terminations=2, Packaging="Tape and Reel", RoHS Compliant=Yes, Series=ESR03, Width=0.031inch
R8: library part CMP-03211-002408-1, "CRGP0603 4.7KΩ 0.25W ±100ppm/°C 1% 50V", Ambient Temperature Range High=+70°C, Manufacturer=TE, Manufacturer Part Number=CRGP0603F4K7, Package=CRGP0603, Power Rating=0.25W, Resistance=4.7KΩ, Temperature="-55°C to +155°C", Temperature Coefficient=±100ppm/°C, Temperature Range High=+155°C, Temperature Range Low=-55°C, Tolerance=0.01, Voltage Rating=50V, Automotive=No, Category=Res, ComponentLink2Description=Datasheet, ComponentLink2URL=https://www.te.com/commerce/DocumentDelivery/DDEController?Action=srchrtrv&DocNm=9-1773463-9&DocType=DS&DocLang=English, Composition="Thick Film", Device Class L1="Passive Components", Device Class L2=Resistors, Device Class L3="Chip SMD Resistors", Height=0.55mm, Ipc Land Pattern Name=RESC16080X45, Lead Free=Yes, Octopart=https://octopart.com/crgp0603f4k7-te+connectivity-91018764, RoHS=TRUE, Series=CRGP
R9: library part CMP-08839-005099-1, "510Ω ±1% 0.25W 0603 Anti-Surge Chip Resistor AEC-Q200", Case/Package=0603, Max Operating Temperature=155°C, Max Power Dissipation=250mW, Min Operating Temperature=-55°C, Resistance=510R, Resistor Type="Thick Film", Temperature Coefficient=100ppm/°C, Tolerance=1%, Features="Automotive AEC-Q200", Number of Terminations=2, Packaging="Tape and Reel", Series=ESR
R10 R15 R16: library part CMP-03211-000885-1, "CRGP 0603 100K 1%", Ambient Temperature Range High=+70°C, Manufacturer=TE, Manufacturer Part Number=CRGP0603F100K, Package=CRGP0603, Power Rating=0.25W, Resistance=100KΩ, Temperature="-55°C to +155°C", Temperature Coefficient=±100ppm/°C, Temperature Range High=+155°C, Temperature Range Low=-55°C, Tolerance=0.01, Voltage Rating=50V, Automotive=No, Category=Res, ComponentLink2Description=Datasheet, ComponentLink2URL=https://www.te.com/commerce/DocumentDelivery/DDEController?Action=srchrtrv&DocNm=9-1773463-9&DocType=DS&DocLang=English, Composition="Thick Film", Device Class L1="Passive Components", Device Class L2=Resistors, Device Class L3="Chip SMD Resistors", Digikey Description="CRGP 0603 100K 1%", Height=0.55mm, Ipc Land Pattern Name=RESC16080X45, Lead Free=Yes, Octopart=https://octopart.com/crgp0603f100k-te+connectivity-91018719, RoHS=TRUE, Series=CRGP
R11: library part CMP-08839-005099-1, Case/Package=0603, Max Operating Temperature=155°C, Max Power Dissipation=250mW, Min Operating Temperature=-55°C, Resistance=510R, Resistor Type="Thick Film", Temperature Coefficient=100ppm/°C, Tolerance=1%, Features="Automotive AEC-Q200", Number of Terminations=2, Packaging="Tape and Reel", Series=ESR
R12: library part CMP-03211-000998-1, "CRGP0603 39KΩ 0.25W ±100ppm/°C 1% 50V", Ambient Temperature Range High=+70°C, Manufacturer=TE, Manufacturer Part Number=CRGP0603F39K, Package=CRGP0603, Power Rating=0.25W, Resistance=39KΩ, Temperature="-55°C to +155°C", Temperature Coefficient=±100ppm/°C, Temperature Range High=+155°C, Temperature Range Low=-55°C, Tolerance=0.01, Voltage Rating=50V, Automotive=No, Category=Res, ComponentLink2Description=Datasheet, ComponentLink2URL=https://www.te.com/commerce/DocumentDelivery/DDEController?Action=srchrtrv&DocNm=9-1773463-9&DocType=DS&DocLang=English, Composition="Thick Film", Device Class L1="Passive Components", Device Class L2=Resistors, Device Class L3="Chip SMD Resistors", Height=0.55mm, Ipc Land Pattern Name=RESC16080X45, Lead Free=Yes, Octopart=https://octopart.com/crgp0603f39k-te+connectivity-91018756, RoHS=TRUE, Series=CRGP
R13: library part CMP-08839-029148-1, "20kΩ ±1% 0.25W 0603 Anti-Surge Chip Resistor AEC-Q200", Case Code (Imperial)=0603, Case Code (Metric)=1608, Max Operating Temperature=155°C, Max Power Dissipation=250mW, Min Operating Temperature=-55°C, Package Quantity=1, Resistance=20kR, Resistor Type="Thick Film", Temperature Coefficient=100ppm/°C, Tolerance=1%, Case/Package=0603, Features="Automotive AEC-Q200", Height=0.022inch, Length=0.063inch, Number of Terminations=2, Packaging="Tape and Reel", RoHS Compliant=Yes, Series=ESR, Width=0.031inch
R14: library part CMP-08839-027973-1, "220kΩ ±1% 0.25W 0603 Anti-Surge Chip Resistor AEC-Q200", Case Code (Imperial)=0603, Case Code (Metric)=1608, Max Operating Temperature=155°C, Max Power Dissipation=250mW, Min Operating Temperature=-55°C, Package Quantity=1, Resistance=220kR, Resistor Type="Thick Film", Temperature Coefficient=100ppm/°C, Tolerance=1%, Case/Package=0603, Features="Automotive AEC-Q200", Height=0.022inch, Length=0.063inch, Number of Terminations=2, Packaging="Tape and Reel", RoHS Compliant=Yes, Series=ESR, Width=0.031inch
R18 R19: library part CMP-05422-000155-1, "RES SMD 10K OHM 1% 1/3W 0603", RoHS Compliant=Yes
R20 R21: library part CMP-08839-028338-1, "2.2kΩ ±1% 0.25W 0603 Anti-Surge Chip Resistor AEC-Q200", Case/Package=0603, Max Operating Temperature=155°C, Max Power Dissipation=250mW, Min Operating Temperature=-55°C, Package Quantity=5000, Resistance=2.2kR, Resistor Type="Thick Film", Temperature Coefficient=100ppm/°C, Tolerance=1%, Height=0.022inch, Length=0.063inch, Number of Terminations=2, Packaging="Tape and Reel", RoHS Compliant=Yes, Series=ESR03, Width=0.031inch
R22 R23: library part CMP-08839-006074-1, "1.8kΩ ±1% 0.25W 0603 Anti-Surge Chip Resistor AEC-Q200", Case/Package=0603, Max Operating Temperature=155°C, Max Power Dissipation=250mW, Min Operating Temperature=-55°C, Package Quantity=5000, Resistance=1.8kR, Resistor Type="Thick Film", Temperature Coefficient=100ppm/°C, Tolerance=1%, Height=0.022inch, Length=0.063inch, Number of Terminations=2, Packaging="Tape and Reel", RoHS Compliant=Yes, Series=ESR03, Width=0.031inch
R24: library part CMP-03412-034001-1, "RES SMD 4.99K OHM 1% 1/4W 1206", Manufacturer=Yageo, Manufacturer Part Number=AC1206FR-074K99L, Package=AC1206, Power Rating=0.25W, Resistance=4.99KΩ, Temperature="-55°C to +155°C", Temperature Range High=+155°C, Temperature Range Low=-55°C, Tolerance=0.01, Voltage Rating=200V, Automotive=Yes, Automotive Grade="Grade 0", Category=Res, ComponentLink2Description=Datasheet, ComponentLink2URL=http://www.yageo.com/NewPortal/yageodocoutput?fileName=/pdf/R-Chip/PYu-AC_51_RoHS_L_6.pdf, Composition="Thick Film", Device Class L1="Passive Components", Device Class L2=Resistors, Device Class L3="Chip SMD Resistors", Digikey Description="RES SMD 4.99K OHM 1% 1/4W 1206", Footprint Url=http://www.yageo.com/exep/pages/download/literatures/PYu-R_Mount_10.pdf, Height=0.65mm, Ipc Land Pattern Name=RESC310160X55, Lead Free=Yes, Octopart=https://octopart.com/ac1206fr-074k99l-yageo-30511146, RoHS=TRUE, Series=AC
R26: library part CMP-03211-005136-1, "CRGP0603 470Ω 0.25W ±100ppm/°C 1% 50V", Ambient Temperature Range High=+70°C, Manufacturer=TE, Manufacturer Part Number=CRGP0603F470R, Package=CRGP0603, Power Rating=0.25W, Resistance=470Ω, Temperature="-55°C to +155°C", Temperature Coefficient=±100ppm/°C, Temperature Range High=+155°C, Temperature Range Low=-55°C, Tolerance=0.01, Voltage Rating=50V, Automotive=No, Category=Res, ComponentLink2Description=Datasheet, ComponentLink2URL=https://www.te.com/commerce/DocumentDelivery/DDEController?Action=srchrtrv&DocNm=9-1773463-9&DocType=DS&DocLang=English, Composition="Thick Film", Device Class L1="Passive Components", Device Class L2=Resistors, Device Class L3="Chip SMD Resistors", Height=0.55mm, Ipc Land Pattern Name=RESC16080X45, Lead Free=Yes, Octopart=https://octopart.com/crgp0603f470r-te+connectivity-91018761, RoHS=TRUE, Series=CRGP
U1: "Single and Dual-Supply, Rail-to-Rail, Low Cost Instrumentation Amplifier", Package="PDIP-8 Analog Devices", Check_prices=https://www.snapeda.com/parts/AD623ANZ/Analog+Devices/view-part/?ref=eda, MF="Analog Devices", MP=AD623ANZ, SnapEDA_Link=https://www.snapeda.com/parts/AD623ANZ/Analog+Devices/view-part/?ref=snap
U2 U3: library part CMP-0187-00321-3, "None", Case/Package=SOIC, Input Bias Current=1pA, Input Offset Voltage (Vos)=4.5mV, Max Operating Temperature=85°C, Max Supply Voltage=6V, Min Operating Temperature=-40°C, Min Supply Voltage=1.8V, Nominal Supply Current=100uA, Operating Supply Voltage=5.5V, Output Current=23mA, Package Quantity=57, Power Supply Rejection Ratio (PSRR)=86dB, Voltage Gain=112dB, Amplifier Type="GENERAL PURPOSE", Bandwidth=1MHz, Common Mode Rejection Ratio=60dB, Contact Plating=Tin, Gain Bandwidth Product=1MHz, Height=1.25mm, Input Offset Voltage-Max=4.5mV, Lead Free="Lead Free", Length=8.65mm, Mount="Surface Mount", Number of Amplifiers=4, Number of Channels=4, Number of Circuits=4, Number of Elements=4, Number of Pins=14, Packaging=Rail/Tube, Radiation Hardening=No, REACH SVHC="No SVHC", RoHS Compliant=Yes, Slew Rate=0.6V/µs, Slew Rate-Nom=0.6V/µs, Supply Current=100uA, Technology=CMOS, Unity Gain Bandwidth Product=1MHz, Width=3.9mm
U4: library part CMP-0384-01181-2, "Single Channel RRIO Operational Amplifier, 80 MHz BW, 35 V/us SR, Industrial, 8-pin SOIC (R-8), Tube", Amplifiers Per Package=1, Generic Part Number=AD8031, Input Bias Current=450nA, Input Offset Voltage=1mV, Manufacturer="Analog Devices", Code_JEDEC=MS-012-AA, ComponentLink1Description="Manufacturer URL", ComponentLink1URL=http://www.analog.com/en/index.html, ComponentLink2Description=Datasheet, ComponentLink2URL=http://www.analog.com/static/imported-files/data_sheets/AD8031_8032.pdf, ComponentLink3Description="Package Specification", ComponentLink3URL=http://www.analog.com/static/imported-files/packages/PKG_PDF/SOIC_Narrow%20(R)/R_8.pdf, ComponentLink4Description="Reference Circuit", ComponentLink4URL=http://www.analog.com/en/all-operational-amplifiers-op-amps/operational-amplifiers-op-amps/ad8031/products/product.html#product-recommendations, DatasheetVersion="Rev. D", Iq/Amp=900uA, Mounting Technology="Surface Mount", PackageDescription="8-Pin Standard Small Outline Package, Body 3.9 x 4.9 mm, Pitch 1.27 mm", PackageReference=R-8, PackageVersion=060506-A, Packing=Tube, PartNumber=AD8031ARZ, RevisionNote="Reference Circuit URL fixed", Slew Rate=35V/us, Small Signal Bandwidth=80MHz, V Span Max=12V, V Span Min=2.7V
U5: library part CMP-04872-000011-1, "DGTL ISO 2.5KV 2CH I2C 8SOIC", Ambient Temperature Range High=+125°C, Ambient Temperature Range Low=-40°C, Manufacturer="Texas Instruments", Max Junction Temp=+136°C, Max Supply Voltage=5.5V, Min Supply Voltage=3V, Nominal Supply Current=1.7-3.1mA, Package=D0008A, Temperature="-40°C to +125°C", Automotive=No, Category=IC, ComponentLink2Description=Datasheet, ComponentLink2URL=http://www.ti.com/lit/ds/symlink/iso1540.pdf, Device Class L1="Integrated Circuits (ICs)", Device Class L2="Interface ICs", Device Class L3=unset, Digikey Description="DGTL ISO 2.5KV 2CH I2C 8SOIC", Height=1.75mm, Interface=I2C,SMBus,Other, Ipc Land Pattern Name=SOIC127P600X175-8, Lead Free=Yes, Manufacturer Part Number=ISO1540DR, Mouser Description="Digital Isolators Low-Power,Bidirec I2C Iso", Octopart=https://octopart.com/iso1540dr-texas+instruments-24334113, RoHS=TRUE, Standoff Height=0.11mm, Temperature Range High=+125°C, Temperature Range Low=-40°C
U6: library part CMP-0475-00280-1, "Switched-Capacitor Voltage Converter with Regulator, 3.5 to 15 V Vin, Adjustable Vout, 8-pin DIP (N8-8), 0 to 100 degC, Pb-Free", Frequency(kHz)=25, Manufacturer="Linear Technology", ComponentLink1Description="Manufacturer URL", ComponentLink1URL=http://www.linear.com/, ComponentLink2Description=Datasheet, ComponentLink2URL=http://cds.linear.com/docs/en/datasheet/1054lfg.pdf, ComponentLink3Description="Package Specification", ComponentLink3URL=http://www.linear.com/docs/en/packaging/05081510_I_N8.pdf, DatasheetVersion="Rev. G", Ishutdown(uA)=100, Isupply(mA)=2.5, Max Iout(mA)=100, Mounting Technology="Through Hole", PackageDescription="8-Pin PDIP, Body 10.16 x 6.48 mm, Pitch 2.54 mm", PackageReference=N8-8, PackageVersion="Rev. I, 07/2011", PartNumber=LT1054CN8#PBF, RoHS=TRUE, Vin Max(V)=15, Vin Min(V)=3.5, Voutput=Adj
U7: library part CMP-0062-02480-3, "3-Terminal Negative Regulator, 3-pin TO-220", Manufacturer="Texas Instruments", PackageTopMarking=NSUZXYTTE#*LM7905CT, PowerWise=N, ComponentLink1Description="Datasheet URL", ComponentLink1URL=http://www.ti.com/general/docs/lit/getliterature.tsp?genericPartNumber=LM7905&fileType=pdf, CompType="LDO IC", PackageDescription="TO-220, Molded, 3 Lead, Straight", PackageReference=NDE0003A, PinCount=3, RoHS=N
U8: library part CMP-2000-04938-1, "Positive Voltage Regulator, 5 V, 1 A, -40 to 125 degC, 3-Pin TO-220, RoHS, Tube", Manufacturer=FairchildSemiconductor, Maximum Input Voltage=35V, Maximum Output Current=2.2(Typ)A, Maximum Quiescent Current=8mA, Operating Temperature=-40to125degC, Output Voltage=5V, Package=3TO-220AB, Package Description="3-Pin Through Hole Device, Body 10 x 4.5 mm, Pitch 2.54 mm", Package Reference=TO-220, Typical Dropout Voltage @ Current=2@1AV, Accuracy=±4%, Category=LinearRegulator, Datasheet URL=https://datasheet.ciiva.com/26904/lm7805ct-26904988.pdf, Datasheet Version=Aug-12, Line Regulation=100mV, Load Regulation=100mV, Manufacturer URL=https://www.fairchildsemi.com/, Mounting=ThroughHole, Number of Outputs=1, Output Type=Fixed, Package URL=https://www.fairchildsemi.com/package-drawings/TO/TO220B03.pdf, Packaging=Rail/Tube, Polarity=Positive, Rad Hard=No, Type=Linear

## Via types
v1: diameter 50, hole 28, Top Layer to Bottom Layer, tented both sides, 15 vias
v2: diameter 50, hole 28, Top Layer to Bottom Layer, 1 vias

## Nets (pads, with @x,y where several pads share a name; then routed paths per layer and width w, separated by ;. In a path a pad name is that pad's centre, name@x,y a point inside that pad or via, vN(x,y) a via of type N, cw(c..) or ccw(c..) an arc to the next point about the centre after c; other vN are vias at no path point)
GND: C8.2 C10.1 C11.1 C12.1 C13.1 C14.2 C15.1 C16.1 C17.1 C19.2 C20.2 C21.1 C22.1 C23.1 C24.1 C25.2 C26.2 DS1.2 J1.2 J2.2 R19.1 R27.2 U2.11 U3.11 U4.4 U5.4 U6.3 U7.1 U8.2 | length 7542.1
  Top Layer w10: v2(1675,2755) v2@1675,2765.82 ; U3.11 U3.11@2385,2920.64 ; C26.2@2480.12,4590 C26.2 C26.2@2485.12,4595 ; C10.1 C10.1@3110,4214.02 ; R19.1 R19.1@3109.76,4479.33 ; C12.1@3359.02,4060 C12.1 C12.1@3365,4054.02
  Top Layer w20: U2.11 1660,2780.82 v2@1675,2765.82 ; 2997.85,3007.15 3035,2970 3282.75,2970 C8.2@3333.09,3020.33
  Top Layer w30: C14.2 1431.14,4056.26 1452.4,4035 U6.3 ; C15.1 2448.32,3906.68 2565.67,3789.33 2565.67,3767.9 2585.64,3747.94 2585.64,3714.36 2625,3675 2797.44,3675 R27.2 ; U8.2 C26.2@2480.12,4590 ; C26.2@2485.12,4595 C21.1@2602.83,4595 ; C22.1 C21.1 C21.1@2602.83,4595 ; C16.1 2921.46,4080 2801.46,4200 U7.1 2705,4210 C23.1 2338.74,4293.74 2510,4465 DS1.2 2589.13,4581.3 C21.1@2602.83,4595 ; C20.2 3109.09,4596.32 R19.1 ; C10.1 3109.02,4359.25 C11.1 R19.1@3109.76,4479.33 ; C10.1@3110,4214.02 C17.1 C12.1@3359.02,4060 ; C8.2@3333.09,3020.33 C8.2 ; C12.1 3382.48,4073.46 U4.4 ; C13.1 C12.1@3365,4054.02
  Top Layer w70: J2.2 1480.54,4619.62 1500.16,4600 1900,4600 1910,4610 2230,4610 2250,4590 U8.2
  Bottom Layer w30: C14.2 1491.26,4056.26 1600,4165 1600,4465 1714.69,4579.69 1755.95,4579.69 C19.2 ; J1.2 2294.87,3814.87 C15.1 2338.74,3950.56 C23.1 ; U8.2 2620.7,4590 2755.7,4725 3017.03,4725 3053.74,4688.29 C20.2
NetC1_1: C1.1 C6.2 R3.2 U2.8 | length 347.4
  Top Layer w10: C1.1 1306.3,2810 C1.1@1320,2796.3 ; 1397.91,2864.45 1408.77,2864.45 R3.2 ; U2.8@1501.89,2874.37 1510,2866.26 U2.8
  Top Layer w20: C1.1@1306.3,2810 1343.46,2810 1397.91,2864.45 ; C6.2 C1.1@1320,2796.3 ; R3.2 U2.8@1501.89,2874.37
NetC1_2: C1.2 R8.2 U2.9 | length 404.6
  Top Layer w10: C1.2@1292.54,2922.7 C1.2 1309.76,2920.24 1323.46,2933.94 1323.46,2934.14 C1.2@1324.32,2935 ; U2.9@1557.66,2860.88 U2.9
  Top Layer w20: C1.2@1292.54,2922.7 R8.2 ; C1.2@1324.32,2935 1535,2935 1557.06,2912.95 1557.06,2898.97 1558.55,2897.47 1558.55,2861.77 U2.9@1557.66,2860.88
NetC2_1: C2.1 R6.2 U2.6 | length 435
  Top Layer w10: C2.1 C2.1@1408.85,3023.61 ; 1558.04,2993.04 1558.04,2997.11 1558.13,2997.2 ; U2.6@1558.13,3049.58 U2.6
  Top Layer w20: C2.1@1408.85,3023.61 1457.46,2975 1540,2975 1558.04,2993.04 ; R6.2 1515,3160 1560,3115 U2.6 ; 1558.13,2997.2 U2.6@1558.13,3049.58
NetC2_2: C2.2 R2.2 R7.1 U2.7 | length 397.3
  Top Layer w10: C2.2@1397.93,3149.68 C2.2 ; R2.2@1438.94,3230.63 R2.2
  Top Layer w20: R7.1 C2.2@1397.93,3149.68 ; R2.2@1438.94,3230.63 1398.02,3189.71 C2.2 1480.41,3149.59 1510,3120 U2.7
NetC3_1: C3.1 R2.1 R5.2 R6.1 | length 236.7
  Top Layer w10: C3.1@1590.63,3284.61 C3.1 C3.1@1594.76,3280
  Top Layer w20: R2.1 R6.1 C3.1@1594.76,3280 ; C3.1@1590.63,3284.61 R5.2
NetC3_2: C3.2 C4.2 C12.2 C13.2 R12.2 R24.2 U1.5 U2.3 U2.5 U2.10 U2.12 U3.3 U3.5 U3.10 U4.6 | length 6439.6
  Top Layer w10: R12.2 R12.2@1483.72,2638.4 ; C4.2@1586.54,2712.39 1600.24,2726.09 C4.2 ; C3.2 1596.3,3170 C3.2@1610,3156.3 ; 1600.24,2808.59 1610,2818.36 U2.10 1610,2910 ; 1702.66,3002.66 1702.66,3003.93 1708.73,3010 1710,3010 1710,3091.64 1716.3,3097.94 1716.3,3101.3 ; U3.3 2335,2732.48 2341.71,2739.19 2341.71,2741.71 ; U3.5 U3.5@2435,2727.73 ; 2435,2835 U3.10@2435,2920.64 ; U1.5 U1.5@2564.38,3424.38 ; R24.2@3422.99,4415.16 R24.2 ; C13.2@3488.94,3875 3475.24,3888.7 C13.2 3475.24,3945.58 C13.2@3490,3960.34 ; U4.6@3545.62,4230.49 U4.6@3567.03,4230.49 ; v1@3550,3865 v1(3550,3875)
  Top Layer w20: R12.2@1483.72,2638.4 1498.4,2638.4 1572.39,2712.39 C4.2@1586.54,2712.39 ; C4.2 1600.24,2808.59 ; C3.2@1610,3156.3 U2.5 1610,2910 1702.66,3002.66 ; U2.12 U2.3@1710,3010 ; 1716.3,3101.3 1810,3195 ; 2341.71,2741.71 2435,2835 2435,2727.73 2492.27,2785 2635,2785 v1(2670,2820)
  Top Layer w30: 1810,3195 2380,3195 2555,3370 U1.5 ; U1.5@2564.38,3424.38 2739.38,3424.38 3000,3685 3370,3685 3475.24,3790.24 C13.2@3475.24,3888.7 ; R24.2@3422.99,4415.16 3470,4368.15 3470,4285 3506.2,4248.8 3524.51,4230.49 ; C13.2@3488.94,3875 v1(3550,3875) ; C13.2@3490,3960.34 C12.2 3490,4210 3510,4230 U4.6
  Bottom Layer w30: v1(2670,2820) 2770,2920 3340,2920 3625,3205 3625,3800 v1(3550,3875)
NetC4_1: C4.1 R3.1 | length 142.1
  Top Layer w10: R3.1@1415,2821.31 R3.1 ; C4.1@1476.3,2758.46 1490,2744.76 C4.1
  Top Layer w20: R3.1@1415,2821.31 1415,2795 1451.54,2758.46 C4.1@1476.3,2758.46
NetC5_1: C5.1 R14.2 U2.13 | length 335.5
  Top Layer w10: C5.1 C5.1@1598.7,2643.7 ; R14.2@1750.63,2736.83 R14.2@1757.74,2743.94 ; U2.13@1757.74,2856.28 U2.13
  Top Layer w20: C5.1@1598.7,2643.7 1643.7,2643.7 1736.83,2736.83 R14.2@1750.63,2736.83 ; R14.2@1757.74,2743.94 U2.13@1757.74,2856.28
NetC5_2: C5.2 C6.1 C7.2 R12.1 | length 499.7
  Top Layer w10: C6.1 C6.1@1340,2575 ; R12.1@1469.68,2575 R12.1 1476.06,2580.32 1485.99,2570.39 R12.1@1485.99,2570.31 ; C7.2@1770.24,2519.76 C7.2
  Top Layer w20: C6.1@1340,2575 R12.1@1469.68,2575 ; R12.1@1485.99,2570.31 1536.54,2519.76 C5.2 C7.2@1770.24,2519.76
NetC7_1: C7.1 R13.2 R14.1 U2.14 | length 338.7
  Top Layer w10: C7.1 1792.95,2635.98 C7.1@1814.53,2657.56 ; U2.14@1810,2848.33 1812.26,2846.06 1812.26,2835.85 U2.14@1818.11,2830 ; R14.1@1812.26,2747.26 R14.1
  Top Layer w20: R14.1@1812.26,2747.26 U2.14@1812.26,2835.85 ; C7.1@1814.53,2657.56 R14.1 ; U2.14@1818.11,2830 R13.2
NetC8_1: C8.1 C20.1 C21.2 C22.2 C26.1 D1.2 J1.1 R18.2 R20.1 R21.1 R25.2 U1.7 U2.4 U3.4 U4.7 U5.1 U8.3 | length 8028.3
  Top Layer w20: v1(2385,2575) U3.4
  Top Layer w40: U2.4 1660,3140 1775,3255 v1(1975,3255) ; D1.2 2255.2,4764.8 U8.3 2334.4,4694.4 2380.7,4694.4 2391.54,4705.24 C21.2 2611.3,4706.54 2712.01,4706.54 2726.46,4720.98 C22.2 2905.68,4720.98 ; R25.2 2897.72,4460 2975,4537.28 C20.1 2905.68,4720.98 ; R21.1 3120,3245 3160,3205 3160,3165 ; C8.1 3222.85,3043.7 3221.55,3045 3160,3045 3160,3165 ; v1(3255,3125) 3252.29,3125 3212.29,3165 3160,3165 ; U4.7 3650,4280 3675,4305 3675,4460 3479.09,4655.91 R18.2 3219.9,4655.91 3154.83,4720.98 2905.68,4720.98
  Bottom Layer w40: v1(1975,3255) 2235,3255 ; J1.1 2190,3505 ; v1(2385,2575) 2130,2830 2130,3150 2235,3255 ; v1(3255,3125) 3255,3274.82 3257.5,3277.32 3257.5,3332.5 2975,3615 C20.1 2969.41,4646.08 2969.41,4634.41 2455,4120 2455,3770 2190,3505 ; 2190,3505 2295,3505 2351.36,3448.64 2351.36,3418.64 U1.7 2351.71,3411.71 2351.71,3371.71 2235,3255
NetC9_1: C9.1 J3.2 R22.1 R23.1 R26.2 U5.8 | length 709.1
  Top Layer w10: R23.1 R23.1@3137.5,2727.5 ; J3.2 J3.2@3140,2580 ; U5.8@3147.85,2810.1 U5.8 3147.85,2845.49 U5.8@3154.66,2852.3 ; R22.1 R22.1@3235.16,2875.16 ; R26.2@3324.84,2875.16 R26.2
  Top Layer w20: R23.1 3135,2797.25 U5.8@3147.85,2810.1 ; J3.2@3137.5,2580 R23.1@3137.5,2727.5 ; J3.2@3140,2580 3223.73,2663.73 C9.1 ; U5.8@3154.66,2852.3 3176.83,2852.3 3199.84,2875.32 R22.1 ; R22.1@3235.16,2875.16 R26.2@3324.84,2875.16
NetC9_2: C9.2 DS2.2 J3.1 U5.5 | length 933
  Top Layer w10: v1(2910,2830) v1@2911.2,2828.8 ; C9.2@3453.16,2648.97 C9.2 ; DS2.2@3453.16,2772.29 DS2.2
  Top Layer w20: v1@2911.2,2828.8 U5.5 ; J3.1 3374.19,2570 C9.2@3453.16,2648.97 ; C9.2 DS2.2@3453.16,2772.29
  Bottom Layer w10: v1(2910,2830) 2910,2819.18 2920.78,2808.39 2920.78,2804.22
  Bottom Layer w20: 2920.78,2804.22 3020,2705 3150,2705 3240,2615 J3.1
NetC10_2: C10.2 C11.2 R18.1 R19.2 U4.3 | length 563.1
  Top Layer w10: R18.1@3219.9,4585 R18.1 ; C11.2@3220,4392.48 C11.2 3220,4327.52 C11.2@3235,4312.52 ; C10.2 C10.2@3250,4230
  Top Layer w30: R18.1@3219.9,4585 3180,4545.1 R19.2 3180,4432.48 C11.2@3220,4392.48 ; C10.2 C11.2@3235,4312.52 ; C10.2@3250,4230 U4.3
NetC14_1: C14.1 C19.1 C25.1 D1.1 J2.1 U6.8 U8.1 | length 1516.1
  Top Layer w10: C25.1@1977.13,4535.47 C25.1
  Top Layer w70: C14.1 1420,4375.12 1420.4,4375.52 1630.52,4375.52 C19.1 2030.2,4505 D1.1 ; U6.8 1985,4280.2 D1.1 ; U8.1 2255.2,4415.2 D1.1
NetC15_2: C15.2 C23.2 U6.5 U7.2 | length 999.9
  Top Layer w30: U6.5 1990.56,3929.44 2011.1,3929.44 2013.46,3927.09 2113.11,3927.09 2128.71,3911.49 C15.2@2152.27,3911.49 ; C15.2 C15.2@2152.27,3911.49 ; 2260,4120 2144.98,4004.98 2144.98,3936.53 2152.27,3929.25 C15.2@2152.27,3911.49 ; C23.2 2264.05,4205.95 2264.05,4120.95 2292.91,4092.09 2698.16,4092.09 2706.07,4100 U7.2
NetC16_2: C16.2 C17.2 C24.2 DS3.2 U1.4 U7.3 | length 1518.9
  Top Layer w10: C16.2@2978.54,3954.02 C16.2@2982.8,3949.76
  Top Layer w30: C24.2 2659.05,3761.37 2659.05,3779.05 2715,3835 U7.3 2875.47,4000 2921.46,3954.02 C16.2 C16.2@2978.54,3954.02 ; DS3.2 3065.87,3811.97 3000.12,3877.72 3000.12,3932.44 2982.8,3949.76 C17.2
  Bottom Layer w30: U1.4 2655,3215 C24.2@2655,3735
NetC18_1: C18.1 U6.2 | length 465.7
  Top Layer w30: U6.2 1691.49,4128.51 1721.49,4128.51 1780,4070 1780,3760.48 1758.74,3739.22 C18.1
NetC18_2: C18.2 U6.4 | length 202.1
  Top Layer w10: C18.2 C18.2@1682.5,3737.5 ; U6.4@1682.5,3932.5 U6.4
  Top Layer w30: C18.2@1682.5,3737.5 U6.4@1682.5,3932.5
NetDS1_1: DS1.1 R25.1 | length 101.1
  Top Layer w10: R25.1@2824.88,4465 R25.1
  Top Layer w30: DS1.1 R25.1@2824.88,4465
NetDS2_1: DS2.1 R26.1 | length 133.5
  Top Layer w10: DS2.1@3446.5,2924.37 DS2.1
  Top Layer w20: R26.1 DS2.1@3446.5,2924.37
NetDS3_1: DS3.1 R27.1 | length 155.8
  Top Layer w10: R27.1 R27.1@2800,3740.43
  Top Layer w30: R27.1@2800,3740.43 2869.57,3810 DS3.1
NetJ1_3: J1.3 R21.2 U5.3 | length 1662.1
  Top Layer w10: J1.3 J1.3@1891.35,3505 ; v1(2925,3260) 2929.01,3255.99 3045.39,3255.99 3055.32,3246.06 R21.2